# Altium PCB Copy of Motor Controller.PcbDoc (part 3 of 3)
Units mm, origin at the board's own origin, x right, y up, seen from the top; angles counter-clockwise.
Board outline 52 x 52 mm, 6 copper layers (Signal 1, GND1, Signal 2, Power, GND2, Signal 3), stack 1.816 mm thick; 182 components, 97 nets, 695 pads, 1437 vias.
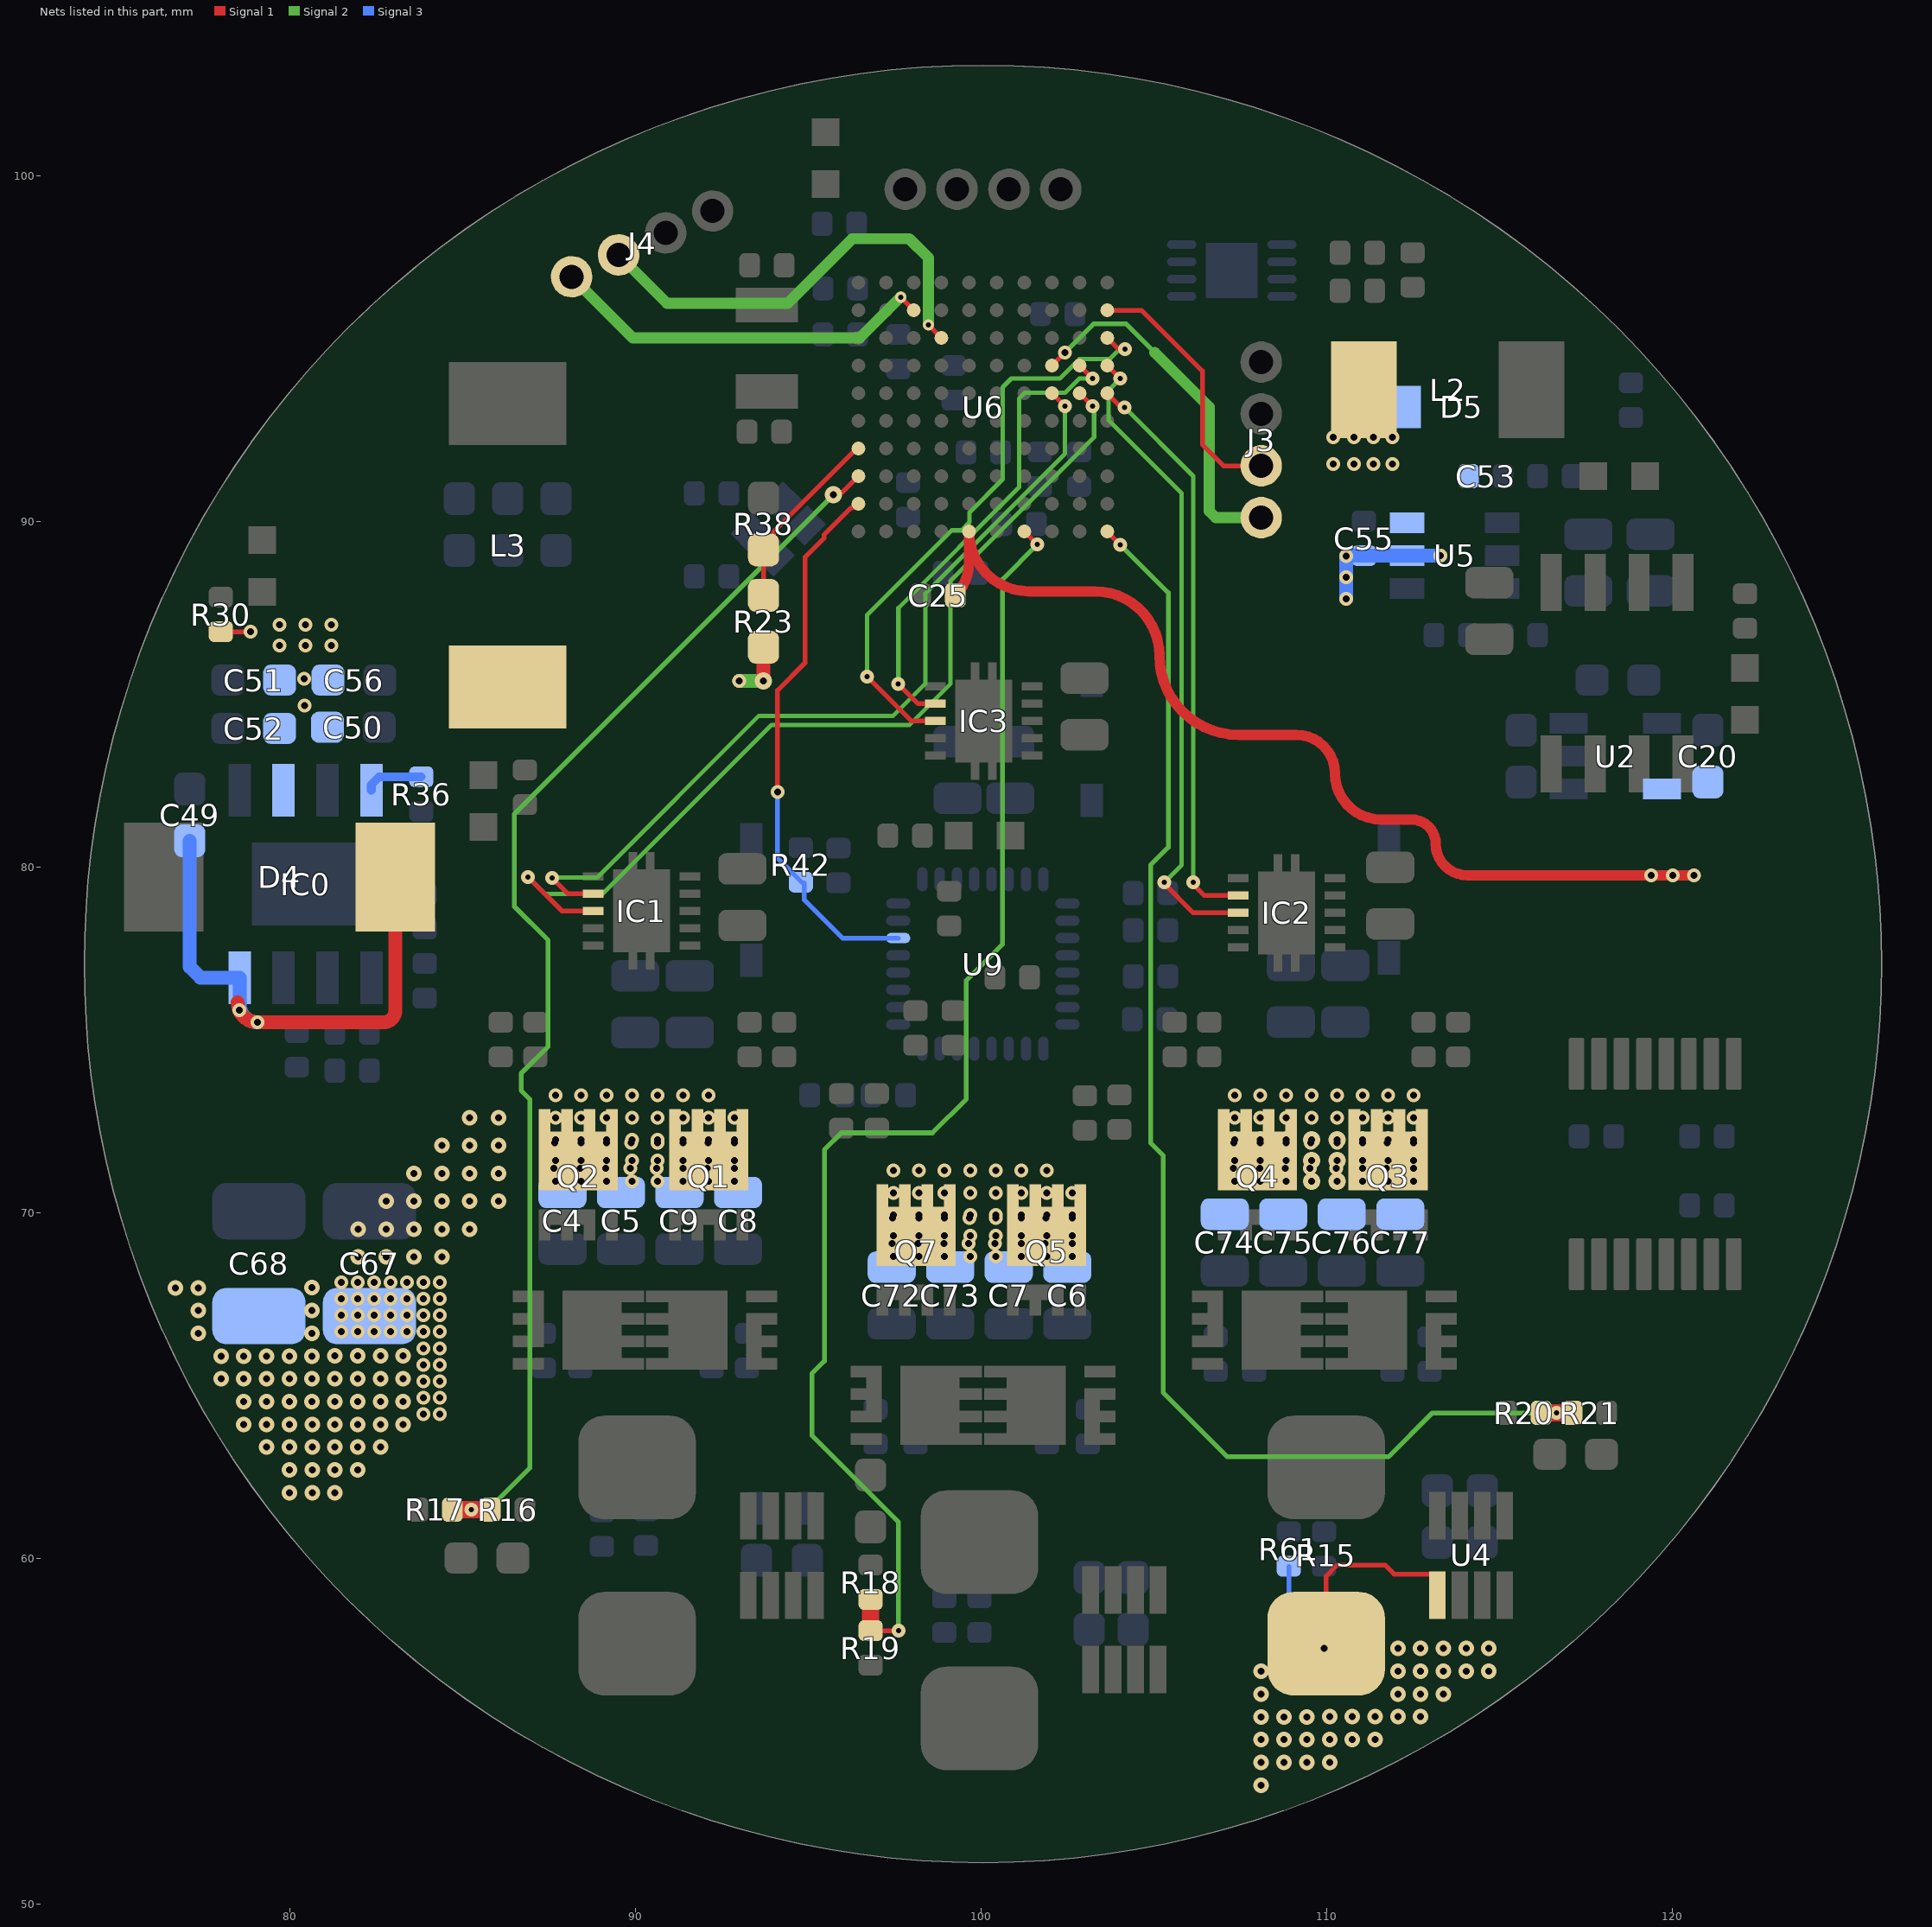
[diagram p7: the nets of this part, all layers, seen from the top]

## Via types
v1: diameter 0.45, hole 0.2, Signal 1 to Signal 3, tented both sides, 210 vias
v2: diameter 0.4, hole 0.2, Signal 1 to Signal 3, tented both sides, 204 vias
v3: diameter 0.45, hole 0.2, Signal 1 to GND1, tented both sides, 168 vias
v4: diameter 0.45, hole 0.2, GND2 to Signal 3, tented both sides, 127 vias
v5: diameter 0.4, hole 0.2, Signal 1 to GND1, tented both sides, 114 vias
v6: diameter 0.4, hole 0.2, Signal 2 to Power, tented both sides, 113 vias
v7: diameter 0.4, hole 0.2, Power to GND2, tented both sides, 100 vias
v8: diameter 0.4, hole 0.2, GND2 to Signal 3, tented both sides, 99 vias
v9: diameter 0.4, hole 0.2, GND1 to Signal 2, tented both sides, 66 vias
v10: diameter 0.4, hole 0.15, Signal 1 to GND1, tented both sides, 62 vias
v11: diameter 0.4, hole 0.15, GND1 to Signal 2, tented both sides, 49 vias
v12: diameter 0.45, hole 0.2, GND1 to Signal 2, tented both sides, 29 vias
v13: diameter 0.5, hole 0.2, Signal 1 to GND1, tented both sides, 25 vias
v14: diameter 0.5/0.5 (per signal layer), hole 0.2, GND2 to Signal 3, tented both sides, 24 vias
v15: diameter 0.45, hole 0.2, Signal 2 to Power, tented both sides, 11 vias
v16: diameter 0.4, hole 0.15, Signal 1 to Signal 3, tented both sides, 9 vias
v17: diameter 0.5, hole 0.2, Signal 1 to Signal 3, 4 vias
v18: diameter 0.5, hole 0.3, Signal 1 to Signal 3, tented both sides, 4 vias
v19: diameter 0.4, hole 0.15, GND2 to Signal 3, tented both sides, 3 vias
v20: diameter 0.3, hole 0.15, Signal 1 to Signal 3, tented both sides, 3 vias
v21: diameter 0.5/0.5 (per signal layer), hole 0.2, GND1 to Signal 2, tented both sides, 2 vias
v22: diameter 0.4, hole 0.2, Signal 1 to Signal 3, 2 vias
v23: diameter 0.4, hole 0.15, Power to GND2, tented both sides, 2 vias
v24: diameter 0.33, hole 0.15, Signal 1 to Signal 3, tented both sides, 2 vias
v25: diameter 0.35, hole 0.15, GND1 to Signal 2, tented both sides, 2 vias
v26: diameter 0.5/0.5 (per signal layer), hole 0.2, Signal 1 to GND1, tented both sides, 1 vias
v27: diameter 0.4, hole 0.2, GND1 to Signal 2, 1 vias
v28: diameter 0.4, hole 0.2, Signal 1 to GND1, 1 vias

## Nets (pads, with @x,y where several pads share a name; then routed paths per layer and width w, separated by ;. In a path a pad name is that pad's centre, name@x,y a point inside that pad or via, vN(x,y) a via of type N, cw(c..) or ccw(c..) an arc to the next point about the centre after c; other vN are vias at no path point) (continued)
"Phase C": R15.1 R61.1 U4.1 | length 8.3
  Signal 1 w0.138: R15.1@109.982,57.521 109.982,59.48 110.302,59.8 111.682,59.8 111.945,59.537 113.027,59.537 U4.1@113.198,59.366
  Signal 3 w0.138: R61.1@108.899,59.762 108.899,58.405 v2(109.919,57.385)
  other v1: 108.103,53.428 108.103,54.087 108.762,54.088 109.42,54.088 110.079,54.089 108.102,54.746 108.761,54.747 109.42,54.747 110.079,54.748 110.738,54.748 111.397,54.749 108.102,55.405 108.761,55.406 109.419,55.406 110.078,55.407 110.737,55.407 111.396,55.408 112.055,55.408 112.714,55.409 108.101,56.064 112.055,56.067 112.714,56.068 113.373,56.068 108.101,56.723 112.054,56.726 112.713,56.726 113.372,56.727 114.031,56.727 114.69,56.728 112.054,57.385 112.713,57.385 113.372,57.386 114.031,57.386 114.69,57.387
PWM1H: IC1.7 U6.E8 | length 24.7
  Signal 1 w0.138: v10(87.589,79.674) 88.039,79.224 IC1.7@88.767,79.224 ; U6.E8@102.047,93.7 v11(102.424,93.323)
  Signal 2 w0.127: v10(87.589,79.674) 87.602,79.688 88.889,79.688 93.568,84.366 97.451,84.366 98.38,85.294 98.38,87.901 102.424,91.946 v11(102.424,93.323)
  other v10: 102.424,93.323
  other v11: 87.589,79.674
PWM1L: IC1.8 U6.E9 | length 27.5
  Signal 1 w0.138: v10(86.886,79.704) 87.866,78.724 IC1.8@88.767,78.724 ; U6.E9@102.847,93.7 v11(103.224,93.323)
  Signal 2 w0.127: v10(86.886,79.704) 87.379,79.211 89.04,79.211 93.934,84.105 97.925,84.105 99.113,85.293 99.113,88.276 103.265,92.428 103.265,93.282 v11(103.224,93.323)
  other v10: 103.224,93.323
  other v11: 86.886,79.704
PWM2H: IC3.7 U6.D9 | length 13.9
  Signal 1 w0.138: v10(97.603,85.288) 98.174,84.717 IC3.7@98.673,84.717 ; U6.D9@102.847,94.5 v10(103.224,94.123)
  Signal 2 w0.127: v10(97.603,85.288) 97.603,87.484 101.092,90.973 101.092,93.545 101.26,93.713 102.426,93.713 102.834,94.121 103.223,94.121 v10(103.224,94.123)
  other v11: 97.603,85.288 103.224,94.123
PWM2L: IC3.8 U6.C10 | length 17.3
  Signal 1 w0.138: v10(96.7,85.5) 97.977,84.223 98.667,84.223 IC3.8@98.673,84.217 ; U6.C10@103.647,95.3 103.949,94.998 104.135,94.998 v11(104.157,94.976)
  Signal 2 w0.127: v10(96.7,85.5) 96.7,87.287 99.145,89.732 99.431,89.732 99.66,89.961 99.66,90.247 100.623,91.21 100.623,93.876 100.87,94.123 102.276,94.123 102.837,94.683 103.712,94.683 103.952,94.924 104.105,94.924 v11(104.157,94.976)
  other v10: 104.157,94.976
  other v11: 96.7,85.5
PWM3H: IC2.7 U6.E10 | length 16.7
  Signal 1 w0.138: U6.E10@103.673,93.663 104.02,93.316 104.12,93.316 v25(104.151,93.285) ; v10(106.135,79.546) 106.135,79.486 106.455,79.166 IC2.7@107.435,79.166
  Signal 2 w0.127: v25(104.151,93.285) 106.135,91.301 106.135,91.201 v10(106.135,79.546)
  other v10: 104.151,93.285
  other v11: 106.135,79.546
PWM3L: IC2.8 U6.D10 | length 18.9
  Signal 1 w0.138: U6.D10@103.647,94.5 v10(104.024,94.123) ; v10(105.294,79.546) 105.294,79.507 106.135,78.666 IC2.8@107.435,78.666
  Signal 2 w0.127: v10(104.024,94.123) 103.688,93.786 103.688,92.915 105.8,90.803 105.8,80.052 v10(105.294,79.546)
  other v11: 105.294,79.546 104.024,94.123
RT: IC0.4 R36.1 | length 1.7
  Signal 3 w0.254: IC0.4@82.355,82.212 82.355,82.375 82.58,82.6 R36.1@83.8,82.6
RX: J4.1 U6.B3 | length 11.3
  Signal 1 w0.138: v24(97.67,96.477) U6.B3@98.047,96.1
  Signal 2 w0.32: J4.1@88.149,97.069 89.918,95.3 96.481,95.3 v24@97.67,96.489
SCK: R42.1 U6.J1 U9.22 | length 16
  Signal 1 w0.138: v2(94.107,82.169) 94.107,85.102 94.899,85.894 94.899,88.952 95.459,89.512 95.459,89.608 96.238,90.387 96.263,90.387 96.376,90.5 U6.J1@96.447,90.5
  Signal 3 w0.138: v2(94.107,82.169) 94.107,80.254 94.828,79.533 94.878,79.533 94.878,79.046 95.986,77.937 U9.22@97.597,77.937
SW: C49.2 D4.1 IC0.8 L3.1 | length 15.7
  Signal 1 w0.4: 78.486,76.073 ccw(c79.059,76.073) v2(79.059,75.5) 82.701,75.5 ccw(c82.701,75.849) 83.05,75.849 D4.1@83.05,79.7
  Signal 3 w0.4: C49.2@77.1,80.75 77.1,77.1 77.412,76.788 IC0.8@78.545,76.788 78.545,76.014 ccw(c79.059,76.014) v2(79.059,75.5)
  other v2: 78.532,75.849
SW1: C53.1 D5.1 L2.1 U5.6
  other v2: 110.181,91.65 110.783,91.65 111.35,91.65 111.899,91.65 110.181,92.425 110.783,92.425 111.35,92.425 111.899,92.425
SWCLK: J3.2 U6.B10 | length 7.6
  Signal 1 w0.138: U6.B10@103.647,96.1 104.636,96.1 106.398,94.339 106.398,92.215 107.012,91.6 J3.2@108.1,91.6
SWDIO: J3.1 U6.D8 | length 10.6
  Signal 1 w0.138: U6.D8@102.047,94.5 v10(102.424,94.877)
  Signal 2 w0.138: v10(102.424,94.877) 103.258,95.711 104.189,95.711 105.023,94.877
  Signal 2 w0.32: 105.023,94.877 106.6,93.3 106.6,90.287 106.787,90.1 J3.1@108.1,90.1
  other v9: 102.424,94.877
TX: J4.2 U6.C4 | length 13
  Signal 1 w0.138: v24(98.47,95.677) U6.C4@98.847,95.3
  Signal 2 w0.32: J4.2@89.509,97.702 90.911,96.3 94.404,96.3 96.275,98.171 97.917,98.171 98.47,97.618 v24@98.47,95.689
VA: R16.2 R17.1 U6.H1 | length 37.1
  Signal 1 w0.138: v21(95.722,90.757) 95.791,90.826 95.973,90.826 U6.H1@96.447,91.3
  Signal 1 w0.5: R17.1@84.7,61.4 v11(85.25,61.4) R16.2@85.8,61.4
  Signal 2 w0.138: v11(85.25,61.4) 85.3,61.35 85.498,61.35 85.519,61.329 85.662,61.329 86.945,62.612 86.945,73.267 86.686,73.527 86.686,74.019 87.467,74.8 87.467,77.871 86.49,78.848 86.49,81.525 v21(95.722,90.757)
  other v10: 85.25,61.4 95.722,90.757
VB: R18.2 R19.1 U6.K7 | length 38.9
  Signal 1 w0.138: R19.1@96.822,57.9 v10(97.604,57.9) ; U6.K7@101.247,89.7 v10(101.624,89.323)
  Signal 1 w0.5: R19.1@96.8,57.9 R18.2@96.8,58.8
  Signal 2 w0.138: v10(97.604,57.9) 97.604,61.043 95.102,63.545 95.102,65.336 95.465,65.699 95.465,71.812 95.953,72.3 98.589,72.3 99.568,73.279 99.568,76.708 100.617,77.757 100.617,88.315 v10(101.624,89.323)
  other v11: 97.604,57.9 101.624,89.323
VBUS: R23.1 R38.2 U6.G1 | length 5.4
  Signal 1 w0.138: R23.1@93.7,87.85 R23.1@93.7,87.85 93.701,89.164 R38.2@93.702,89.165 93.987,89.45 93.987,89.688 96.4,92.1 U6.G1@96.447,92.1
VC: R20.2 R21.1 U6.K10 | length 39.6
  Signal 1 w0.138: U6.K10@103.647,89.7 103.647,89.691 v10(104.024,89.313)
  Signal 1 w0.5: R20.2@116.2,64.2 v10(116.65,64.2) R21.1@117.1,64.2
  Signal 2 w0.138: v10(104.024,89.313) 105.41,87.928 105.41,80.558 104.898,80.046 104.898,72.01 105.26,71.648 105.26,64.79 107.121,62.93 111.782,62.93 113.053,64.2 v10(116.65,64.2)
  other v11: 116.65,64.2 104.024,89.313
VCC: C4.1 C5.1 C6.1 C7.1 C8.1 C9.1 C50.1 C51.1 C52.1 C55.1 C56.1 C67.1 C68.1 C72.1 C73.1 C74.1 C75.1 C76.1 C77.1 IC0.2 Q1.5 Q1.6 Q1.7 Q1.8 Q1.9 Q2.5 Q2.6 Q2.7 Q2.8 Q2.9 Q3.5 Q3.6 Q3.7 Q3.8 Q3.9 Q4.5 Q4.6 Q4.7 Q4.8 Q4.9 Q5.5 Q5.6 Q5.7 Q5.8 Q5.9 Q7.5 Q7.6 Q7.7 Q7.8 Q7.9 R23.2 R30.2 U5.5 | length 6.5
  Signal 1 w0.138: R30.2@78,86.8 v2(78.854,86.8)
  Signal 1 w0.4: v26@93.7,85.371 R23.2@93.7,86.35
  Signal 2 w0.4: v6(92.995,85.371) v26(93.699,85.371)
  Signal 3 w0.4: v2(110.562,87.75) v2(110.562,88.994) ; v2@110.562,89 C55.1@111.072,89 U5.5@112.325,89 v2(113.279,89)
  other v1: 79.983,61.889 80.642,61.89 81.301,61.89 79.983,62.548 80.642,62.549 81.301,62.549 81.96,62.55 79.323,63.207 79.982,63.207 80.641,63.208 81.3,63.208 81.959,63.209 82.618,63.209 78.664,63.865 79.323,63.866 79.982,63.866 80.641,63.867 81.3,63.867 81.959,63.868 82.618,63.868 83.277,63.869 78.663,64.524 79.322,64.525 79.981,64.525 80.64,64.526 81.299,64.526 81.958,64.527 82.617,64.527 83.276,64.528 78.004,65.183 78.663,65.183 79.322,65.184 79.981,65.184 80.64,65.185 81.299,65.185 81.958,65.186 82.617,65.186 83.276,65.187 78.003,65.842 78.662,65.842 79.321,65.843 79.98,65.843 80.639,65.844 81.298,65.844 81.957,65.845 82.616,65.845 83.275,65.846 77.344,66.5 80.639,66.503 77.343,67.159 80.638,67.162 76.684,67.818 77.343,67.818 80.638,67.82
  other v2: 80.42,84.664 80.408,85.441 79.7,86.4 80.446,86.4 81.2,86.4 79.7,86.995 80.446,86.995 81.2,86.995 110.562,88.372
  other v3: 81.973,68.711 82.779,68.711 83.586,68.711 84.392,68.711 81.973,69.518 82.779,69.518 83.586,69.518 84.392,69.518 85.198,69.518 82.779,70.324 83.586,70.324 84.392,70.324 85.198,70.324 86.04,70.324 83.586,71.13 84.392,71.13 85.198,71.13 86.04,71.13 84.392,71.937 85.198,71.937 86.04,71.937 85.198,72.743 86.04,72.743
  other v5: 97.416,69.101 98.178,69.101 98.916,69.101 99.632,69.101 100.394,69.101 101.156,69.101 101.848,69.101 102.633,69.101 97.439,69.833 98.201,69.833 98.94,69.833 99.655,69.833 100.417,69.833 101.156,69.833 101.871,69.833 102.633,69.833 87.637,71.278 88.399,71.278 89.137,71.278 89.853,71.278 90.615,71.278 91.377,71.278 92.069,71.278 92.854,71.278 107.292,71.278 108.054,71.278 108.792,71.278 109.508,71.278 110.27,71.278 111.032,71.278 111.724,71.278 112.509,71.278 87.66,72.01 88.422,72.01 89.161,72.01 89.876,72.01 90.638,72.01 91.377,72.01 92.092,72.01 92.854,72.01 107.315,72.01 108.077,72.01 108.816,72.01 109.531,72.01 110.293,72.01 111.032,72.01 111.747,72.01 112.509,72.01
  other v6: 83.861,64.165 84.337,64.165 83.861,64.641 84.337,64.641 83.861,65.117 84.337,65.117 83.861,65.593 84.337,65.593 83.861,66.069 84.337,66.069 81.481,66.545 81.957,66.545 82.433,66.545 82.909,66.545 83.385,66.545 83.861,66.545 84.337,66.545 81.481,67.021 81.957,67.021 82.433,67.021 82.909,67.021 83.385,67.021 83.861,67.021 84.337,67.021 81.481,67.497 81.957,67.497 82.433,67.497 82.909,67.497 83.385,67.497 83.861,67.497 84.337,67.497 81.481,67.973 81.957,67.973 82.433,67.973 82.909,67.973 83.385,67.973 83.861,67.973 84.337,67.973 97.462,70.566 98.201,70.566 98.94,70.566 99.678,70.566 100.417,70.566 101.156,70.566 101.894,70.566 102.633,70.566 97.462,71.208 98.201,71.208 98.94,71.208 99.678,71.208 100.417,71.208 101.156,71.208 101.894,71.208 87.683,72.743 88.422,72.743 89.161,72.743 89.899,72.743 90.638,72.743 91.377,72.743 92.115,72.743 92.854,72.743 107.338,72.743 108.077,72.743 108.816,72.743 109.554,72.743 110.293,72.743 111.032,72.743 111.77,72.743 112.509,72.743 87.683,73.385 88.422,73.385 89.161,73.385 89.899,73.385 90.638,73.385 91.377,73.385 92.115,73.385 107.338,73.385 108.077,73.385 108.816,73.385 109.554,73.385 110.293,73.385 111.032,73.385 111.77,73.385 112.509,73.385
  other v7: 97.462,68.729 98.201,68.729 98.94,68.729 99.678,68.729 100.417,68.729 101.156,68.729 101.894,68.729 102.633,68.729 97.462,69.327 98.201,69.327 98.94,69.327 99.678,69.327 100.417,69.327 101.156,69.327 101.894,69.327 102.633,69.327 97.462,69.924 98.201,69.924 98.94,69.924 99.678,69.924 100.417,69.924 101.156,69.924 101.894,69.924 102.633,69.924 87.683,70.906 88.422,70.906 89.161,70.906 89.899,70.906 90.638,70.906 91.377,70.906 92.115,70.906 92.854,70.906 107.338,70.906 108.077,70.906 108.816,70.906 109.554,70.906 110.293,70.906 111.032,70.906 111.77,70.906 112.509,70.906 87.683,71.503 88.422,71.503 89.161,71.503 89.899,71.503 90.638,71.503 91.377,71.503 92.115,71.503 92.854,71.503 107.338,71.503 108.077,71.503 108.816,71.503 109.554,71.503 110.293,71.503 111.032,71.503 111.77,71.503 112.509,71.503 87.683,72.101 88.422,72.101 89.161,72.101 89.899,72.101 90.638,72.101 91.377,72.101 92.115,72.101 92.854,72.101 107.338,72.101 108.077,72.101 108.816,72.101 109.554,72.101 110.293,72.101 111.032,72.101 111.77,72.101 112.509,72.101
  other v8: 97.462,68.729 98.201,68.729 98.94,68.729 99.678,68.729 100.417,68.729 101.156,68.729 101.894,68.729 102.633,68.729 97.462,69.327 98.201,69.327 98.94,69.327 99.678,69.327 100.417,69.327 101.156,69.327 101.894,69.327 102.633,69.327 97.462,69.924 98.201,69.924 98.94,69.924 99.678,69.924 100.417,69.924 101.156,69.924 101.894,69.924 102.633,69.924 87.683,70.906 88.422,70.906 89.161,70.906 89.899,70.906 90.638,70.906 91.377,70.906 92.115,70.906 92.854,70.906 87.683,71.503 88.422,71.503 89.161,71.503 89.899,71.503 90.638,71.503 91.377,71.503 92.115,71.503 92.854,71.503 87.683,72.101 88.422,72.101 89.161,72.101 89.899,72.101 90.638,72.101 91.377,72.101 92.115,72.101 92.854,72.101
  other v9: 97.416,69.101 98.178,69.101 98.916,69.101 99.632,69.101 100.394,69.101 101.156,69.101 101.848,69.101 102.633,69.101 97.439,69.833 98.201,69.833 98.94,69.833 99.655,69.833 100.417,69.833 101.156,69.833 101.871,69.833 102.633,69.833 87.637,71.278 88.399,71.278 89.137,71.278 89.853,71.278 90.615,71.278 91.377,71.278 92.069,71.278 92.854,71.278 107.292,71.278 108.054,71.278 108.792,71.278 109.508,71.278 110.27,71.278 111.032,71.278 111.724,71.278 112.509,71.278 87.66,72.01 88.422,72.01 89.161,72.01 89.876,72.01 90.638,72.01 91.377,72.01 92.092,72.01 92.854,72.01 107.315,72.01 108.077,72.01 108.816,72.01 109.531,72.01 110.293,72.01 111.032,72.01 111.747,72.01 112.509,72.01
  other v12: 81.973,68.711 82.779,68.711 83.586,68.711 84.392,68.711 81.973,69.518 82.779,69.518 83.586,69.518 84.392,69.518 85.198,69.518 82.779,70.324 83.586,70.324 84.392,70.324 85.198,70.324 86.04,70.324 83.586,71.13 84.392,71.13 85.198,71.13 86.04,71.13 84.392,71.937 85.198,71.937 86.04,71.937 85.198,72.743 86.04,72.743
  other v14: 107.338,70.906 108.077,70.906 108.816,70.906 109.554,70.906 110.293,70.906 111.032,70.906 111.77,70.906 112.509,70.906 107.338,71.503 108.077,71.503 108.816,71.503 109.554,71.503 110.293,71.503 111.032,71.503 111.77,71.503 112.509,71.503 107.338,72.101 108.077,72.101 108.816,72.101 109.554,72.101 110.293,72.101 111.032,72.101 111.77,72.101 112.509,72.101
  other v21: 93.699,85.371
VDDA: C20.1 C25.1 U2.5 U6.K5 | length 28.6
  Signal 1 w0.3: C25.1@99.253,87.85 ccw(c98.3,88.802) 99.647,88.802 U6.K5@99.647,89.7 ccw(c101.38,89.7) 101.38,87.967 103.295,87.967 cw(c103.295,86.106) 105.156,86.106 ccw(c107.446,86.106) 107.446,83.816 109.119,83.816 cw(c109.119,82.7) 110.235,82.7 ccw(c111.569,82.7) 111.569,81.366 112.446,81.366 cw(c112.446,80.662) 113.15,80.662 ccw(c114.056,80.662) 114.056,79.756 v2(119.38,79.756) v2(120.008,79.756) v2(120.625,79.756)
pads on no net: IC0.3 IC1.2 IC2.2 IC3.2 J3.4 J4.4 U5.4 U6.A2 U6.A5 U6.A6 U6.A7 U6.A8 U6.A9 U6.A10 U6.B1 U6.B2 U6.B4 U6.B6 U6.B7 U6.B8 U6.B9 U6.C2 U6.C3 U6.C5 U6.C6 U6.C7 U6.C8 U6.C9 U6.D4 U6.E3 U6.E4 U6.F1 U6.F2 U6.F4 U6.F8 U6.F9 U6.F10 U6.G2 U6.G3 U6.G4 U6.G5 U6.G6 U6.G7 U6.G8 U6.G9 U6.H2 U6.H3 U6.H4 U6.H5 U6.H6 U6.H7 U6.H8 U6.H9 U6.J3 U6.J4 U6.J6 U6.J7 U6.J8 U6.J9 U6.K3 U7.5 U7.6 U7.7 U7.10 U7.11 U7.12 U8.5 U9.9 U9.10 U9.12 U9.13 U9.15 U9.16 U9.18 U9.25 U9.26 U9.28 U9.29 U9.31 U9.32 U10.5 U10.8

## Polygon pours and split planes (outlines as drawn)
VCC on Signal 3 (solid, pour order 146): 80.414,60.212 ccw(c80.421,63.086) 82.449,61.049 82.633,61.233 ccw(c80.466,63.4) 83.531,63.401 cw(c84.239,63.401) 84.239,64.109 84.709,64.109 ccw(c84.709,64.69) 85.29,64.69 85.29,65.429 cw(c85.942,65.429) 85.689,66.031 ccw(c85.29,66.98) 86.32,66.98 86.32,69.65 cw(c86.79,69.65) 86.79,70.12 93.658,70.12 cw(c93.658,68.803) 94.589,69.734 95.942,68.382 ccw(c96.932,69.372) 96.932,67.972 102.985,67.972 ccw(c102.985,68.167) 103.111,68.017 cw(c103.61,67.422) 103.61,68.199 104.348,68.199 ccw(c104.348,69.226) 105.074,68.5 105.595,69.021 cw(c106.734,67.882) 106.734,69.493 112.688,69.493 ccw(c112.688,69.778) 112.973,69.778 112.973,72.797 ccw(c112.777,72.797) 112.777,72.993 106.501,72.993 ccw(c106.501,72.787) 106.295,72.787 cw(c105.988,72.787) 105.988,72.48 105.782,72.48 93.945,72.48 cw(c93.945,72.756) 93.669,72.756 93.669,73.377 ccw(c93.426,73.377) 93.426,73.62 87.296,73.62 ccw(c87.295,72.887) 86.776,73.405 85.007,71.636 ccw(c85.82,70.822) 84.67,70.822 84.67,69.137 cw(c84.099,69.136) 84.502,68.732 84.139,68.369 cw(c83.731,68.776) 83.731,68.2 75.7,68.2 ccw(c100.05,77.185)
GND on Signal 3 "GND_L06_P122" (solid, pour order 122): 105.922,66.87 105.922,67.645 106.493,68.216 106.493,68.535 106.721,68.763 112.354,68.763 112.582,68.535 112.582,68.216 113.153,67.645 113.153,66.87
+3.3V on Signal 3 "NONET_L03_P-001" (solid, pour order 111): 120.064,89.165 120.064,90.075 120.061,90.804 116.874,90.804 116.874,90.075 116.874,89.165
SW1 on Signal 3 "SW1_L06_P043" (solid, pour order 43): 111.846,90.95 111.828,89.65 112.825,89.65 112.825,90.089 cw(c112.986,90.089) 112.872,90.203 113.619,90.95 114.25,90.95 ccw(c114.25,91.1) 114.4,91.1 114.4,91.5 ccw(c114.25,91.5) 114.25,91.65 113.76,91.65 112.72,92.69 112.72,93.9 109.9,93.9 109.9,90.95
GND on Signal 3 "GND_L06_P121" (solid, pour order 121): 96.143,65.338 96.143,66.113 96.714,66.684 96.714,67.003 96.942,67.231 102.575,67.231 102.803,67.003 102.803,66.684 103.374,66.113 103.374,65.338
+12V on Signal 3 "+12V_L06_P058" (solid, pour order 58): 87.725,90.175 84.875,90.175 cw(c84.875,90.45) 84.6,90.45 84.6,94.6 88,94.6 88,92.2 88,90.45 cw(c87.725,90.45)
GND on Signal 3 "GND_L06_P120" (solid, pour order 120): 86.618,67.497 86.618,68.272 87.189,68.843 87.189,69.162 87.417,69.39 93.05,69.39 93.278,69.162 93.278,68.843 93.849,68.272 93.849,67.497
GND on Signal 3 "GND_L06_P088" (solid, pour order 88): 75.085,69.944 cw(c100.314,77.682) 74.264,73.464 74.3,73.55 74.893,73.55 cw(c74.893,71.793) 76.136,73.036 76.136,73.035 ccw(c77.066,73.966) 77.066,72.65 79.076,72.65 ccw(c79.076,73.624) 79.764,72.936 cw(c80.283,72.417) 80.283,73.15 82.034,73.15 cw(c82.034,71.734) 83.036,72.736 cw(c81.431,71.131) 83.7,71.131 83.7,69.68 83.65,69.63 75.872,69.63 cw(c75.872,70.772)
VDDA on Signal 3 "NONET_L03_P-001" (solid, pour order 108): 119.15,82.55 120.25,82.55 120.625,82.925 121.264,82.925 121.8,82.388 121.8,79.375 119.15,79.375 119.15,81.95
VCC on Signal 3 "VCC_L06_P053" (solid, pour order 53): 79.49,81.449 80.14,81.449 80.14,82.974 80.752,83.586 81.331,83.586 ccw(c81.331,83.811) 81.556,83.811 81.556,85.737 81.556,87.3 79.225,87.3 79.225,85.718 79.225,83.682 79.49,83.417 79.49,82.974
"Phase C" on Signal 3 "PHASE_C_L06_P092" (solid, pour order 92): 107.79,52.364 ccw(c100.05,77.185) 115.448,56.235 115.448,57.452 114.906,57.994 108.659,57.994 107.79,57.125
"Phase B" on Signal 3 "PHASE_B_L06_P091" (solid, pour order 91): 93.98,51.919 ccw(c100.05,77.185) 106.092,51.912 106.1,51.913 106.1,55.4 105.7,55.8 94.444,55.8 93.98,55.337
"Phase A" on Signal 3 "PHASE_A_L06_P093" (solid, pour order 93): 82.662,57.868 ccw(c100.05,77.185) 92.402,52.345 92.4,52.345 92.4,56.1 89.9,58.6 82.8,58.6 82.662,58.462
GND on Signal 1 "GND_L01_P142" (solid, pour order 142): 75.085,69.944 cw(c100.313,77.682) 74.264,73.464 74.3,73.55 74.893,73.55 cw(c74.893,71.793) 76.009,73.15 80.283,73.15 81.941,73.15 cw(c81.941,71.491) 83.561,71.854 81.314,69.63 75.872,69.63 cw(c75.872,70.772)
GND on Signal 1 "GND_L01_P117" (solid, pour order 117): 106.996,67.736 107.017,67.757 107.017,68.856 106.631,69.243 105.971,69.243 104.927,68.199 104.013,68.199 103.866,68.052 103.866,66.098 106.096,66.098 106.099,66.101 106.996,66.101
GND on Signal 1 "NONET_L03_P-001" (solid, pour order 112): 87.341,67.736 87.339,67.738 85.075,67.738 84.711,67.374 84.711,64.411 83,62.7 83,59.8 83.7,59.1 85.2,59.1 85.425,59.325 85.425,60.225 85.2,60.45 84.6,60.45 83.956,61.094 83.956,62.056 84.616,62.716 87.341,62.716 87.341,66.101
VCC on Signal 1 "NONET_L03_P-001" (solid, pour order 105): 81.119,61.619 84.3,64.8 84.3,67.742 87.191,70.633 93.691,70.633 95.868,68.456 103.04,68.456 104.951,68.456 106.341,69.846 107.128,70.633 113.133,70.633 113.2,70.7 113.2,72.993 106.1,72.993 106.1,72.191 104.725,70.816 103.04,70.816 95.88,70.816 94.766,71.93 94.766,73.4 85.5,73.4 85,72.9 80.3,68.2 75.643,68.2 75.661,68.171 ccw(c100.05,77.185) 81.119,59.36
+5V on Signal 1 "NONET_L03_P-001" (solid, pour order 133): 114.973,92.405 114.973,96.023 117.472,96.023 117.472,92.405
GND on Signal 1 "NONET_L03_P-001" (solid, pour order 113): 93.202,67.085 93.202,65.02 94.079,64.143 95.998,64.143 96.22,63.921 96.223,63.923 97.12,63.923 97.12,65.558 95.593,67.085 94.105,67.085 94.102,67.088
GND on Signal 1 "GND_L01_P064" (solid, pour order 64): 107.135,78.046 107.91,78.046 108.01,77.946 108.01,77.466 108.46,77.466 108.46,76.966 108.71,76.966 108.71,77.466 108.96,77.466 108.96,76.966 109.21,76.966 109.21,77.466 109.66,77.466 109.66,79.866 109.21,79.866 109.21,80.366 108.96,80.366 108.96,79.866 108.71,79.866 108.71,80.366 108.46,80.366 108.46,79.866 108.01,79.866 108.01,78.304 107.992,78.286 107.135,78.286
GND on Signal 1 "GND_L01_P065" (solid, pour order 65): 98.373,83.597 99.148,83.597 99.248,83.497 99.248,83.017 99.698,83.017 99.698,82.517 99.948,82.517 99.948,83.017 100.198,83.017 100.198,82.517 100.448,82.517 100.448,83.017 100.898,83.017 100.898,85.417 100.448,85.417 100.448,85.917 100.198,85.917 100.198,85.417 99.948,85.417 99.948,85.917 99.698,85.917 99.698,85.417 99.248,85.417 99.248,83.855 99.23,83.837 98.373,83.837
SW on Signal 1 "SW_L01_P057" (solid, pour order 57): 81.9,78.125 81.9,83.7 84.6,86.4 88,86.4 88,84 84.8,84 84.2,83.4 84.2,78.125
GND on Signal 1 "GND_L01_P076" (solid, pour order 76): 113.608,59.614 116.84,59.614 116.84,58.244 113.608,58.244
GND on Signal 1 "GND_L01_P118" (solid, pour order 118): 112.857,67.085 112.857,65.45 112.903,65.405 112.903,64.082 113.042,63.943 114.43,63.943 114.43,64.752 114.575,64.897 116.332,64.897 116.88,65.445 116.88,66.756 114.694,66.756 114.362,67.088 112.86,67.088
GND on Signal 1 "NONET_L03_P-001" (solid, pour order 116): 102.981,64.909 102.981,61.819 103.5,61.3 106.4,61.3 106.858,61.758 106.858,63.593 106.708,63.743 106.308,63.743 105.551,64.5 104.5,64.5 104.089,64.911 103.881,64.911
GND on Signal 1 "GND_L01_P063" (solid, pour order 63): 88.467,78.104 89.242,78.104 89.342,78.004 89.342,77.524 89.792,77.524 89.792,77.024 90.042,77.024 90.042,77.524 90.292,77.524 90.292,77.024 90.542,77.024 90.542,77.524 90.992,77.524 90.992,79.924 90.542,79.924 90.542,80.424 90.292,80.424 90.292,79.924 90.042,79.924 90.042,80.424 89.792,80.424 89.792,79.924 89.342,79.924 89.342,78.362 89.324,78.344 88.467,78.344
"Phase C" on Signal 1 "PHASE_C_L01_P079" (solid, pour order 79): 107.75,52.395 ccw(c107.8,52.4) 107.848,52.383 ccw(c100.05,77.185) 116.632,57.161 116.636,57.236 ccw(c115.634,56.234) 115.634,57.65 113.871,57.65 cw(c113.871,60.666) 111.739,58.534 111.646,58.627 ccw(c110.606,57.587) 110.606,59.057 108.863,59.057 ccw(c108.863,57.944) 107.75,57.944
"Phase B" on Signal 1 "PHASE_B_L01_P078" (solid, pour order 78): 94,51.9 94,54.83 cw(c95.27,54.83) 95.27,56.1 97.6,56.1 ccw(c97.6,56.4) 97.9,56.4 cw(c98.362,56.4) 98.362,56.862 101.724,56.862 cw(c101.724,56.4) 102.186,56.4 cw(c102.186,56.386) 102.2,56.386 102.2,56.07 ccw(c103.47,56.07) 103.47,54.8 105,54.8 cw(c105,53.7) 106.1,53.7 106.1,51.914 106.087,51.898 cw(c100.047,77.187)
HS3 on Signal 1 "HS3_L01_P002" (solid, pour order 2): 107.536,61.852 107.536,68.642 106.848,69.329 106.848,70.089 108.484,70.089 108.484,67.74 110.626,67.74 110.626,70.089 111.891,70.089 112.321,70.089 112.315,69.726 112.321,69.196 112.291,69.193 112.289,67.74 112.317,67.738 112.303,61.852
HS2 on Signal 1 "HS2_L01_P001" (solid, pour order 1): 97.663,59.663 97.663,66.449 96.972,67.139 96.972,67.9 98.607,67.9 98.607,65.549 100.752,65.549 100.752,67.9 102.014,67.9 102.39,67.9 102.39,65.552 102.441,65.549 102.426,59.663
HS1 on Signal 1 "HS1_L01_P000" (solid, pour order 0): 87.884,61.849 87.884,68.408 ccw(c87.47,68.408) 87.762,68.701 87.191,69.273 87.191,70.086 88.827,70.086 88.827,67.737 90.986,67.737 90.986,70.086 92.18,70.086 92.611,70.086 92.604,69.723 92.611,69.193 92.581,69.19 92.579,67.737 92.66,67.733 92.646,61.849
"Phase A" on Signal 1 "PHASE_A_L01_P084" (solid, pour order 84): 83.1,57.5 cw(c85.031,55.569) 85.031,58.3 87.833,58.3 ccw(c87.833,59.087) 88.389,58.531 cw(c89.539,57.38) 89.539,59.007 91.137,59.007 cw(c91.137,57.944) 92.2,57.944 92.2,52.4 cw(c100.047,77.187)
GND on Signal 1 "GND_L01_P060" (solid, pour order 60): 77.5,81.275 77.5,76.4 75.184,76.4 75.184,81.275
+12V on Signal 1 "+12V_L01_P059" (solid, pour order 59): 84.6,94.6 84.6,90.336 84.761,90.175 87.839,90.175 88,90.336 88,94.6
SW1 on Signal 1 "SW1_L01_P044" (solid, pour order 44): 110.022,95.195 112.122,95.195 112.122,90.9 110.022,90.9
VCC on Top Solder "NONET_L03_P-001" (solid, pour order 144): 81.119,61.619 84.3,64.8 84.3,67.74 85.115,68.555 83.466,70.204 81.462,68.2 75.643,68.2 75.661,68.171 ccw(c100.051,77.185) 81.119,59.36
GND on Top Solder "GND_L01_P143" (solid, pour order 143): 75.085,69.944 cw(c100.313,77.682) 74.264,73.464 74.3,73.55 74.893,73.55 cw(c74.893,71.793) 76.009,73.15 80.283,73.15 81.941,73.15 cw(c81.941,71.491) 83.456,72.169 80.891,69.63 75.872,69.63 cw(c75.872,70.772)
"Phase C" on Top Solder "PHASE_C_L01_P086" (solid, pour order 86): 107.75,52.395 ccw(c107.8,52.4) 107.848,52.383 ccw(c100.05,77.185) 116.632,57.161 116.636,57.236 ccw(c115.634,56.234) 115.634,57.65 113.871,57.65 cw(c113.871,60.666) 111.739,58.534 111.646,58.627 ccw(c110.606,57.587) 110.606,59.057 108.863,59.057 ccw(c108.863,57.944) 107.75,57.944
"Phase B" on Top Solder "PHASE_B_L01_P085" (solid, pour order 85): 94,51.9 94,54.83 cw(c95.27,54.83) 95.27,56.1 97.6,56.1 ccw(c97.6,56.4) 97.9,56.4 cw(c98.362,56.4) 98.362,56.862 101.724,56.862 cw(c101.724,56.4) 102.186,56.4 cw(c102.186,56.386) 102.2,56.386 102.2,56.07 ccw(c103.47,56.07) 103.47,54.8 105,54.8 cw(c105,53.7) 106.1,53.7 106.1,51.914 106.087,51.898 cw(c100.047,77.187)
"Phase A" on Top Solder "PHASE_A_L01_P077" (solid, pour order 77): 83.1,57.5 cw(c85.031,55.569) 85.031,58.3 87.833,58.3 ccw(c87.833,59.087) 88.389,58.531 cw(c89.539,57.38) 89.539,59.007 91.137,59.007 cw(c91.137,57.944) 92.2,57.944 92.2,52.4 cw(c100.047,77.187)
GND on GND2 "GND_L05_P128" (solid, pour order 128): 74.382,73.137 cw(c100.073,77.137) 74.382,81.137 cw(c100.073,77.137) 81.688,95.522 cw(c100.073,77.137) 118.458,95.522 cw(c100.073,77.137) 125.763,81.137 cw(c100.073,77.137) 125.763,73.137 cw(c100.073,77.137) 118.458,58.752 cw(c100.073,77.137) 81.688,58.752 cw(c100.073,77.137)
"Phase C" on Bottom Solder "PHASE_C_L04_P096" (solid, pour order 96): 107.79,52.364 ccw(c100.05,77.185) 115.448,56.235 115.448,57.452 114.906,57.994 108.659,57.994 107.79,57.125
"Phase B" on Bottom Solder "PHASE_B_L04_P095" (solid, pour order 95): 93.98,51.919 ccw(c100.05,77.185) 106.092,51.912 106.1,51.913 106.1,55.4 105.7,55.8 94.444,55.8 93.98,55.337
"Phase A" on Bottom Solder "PHASE_A_L04_P094" (solid, pour order 94): 82.662,57.868 ccw(c100.05,77.185) 92.402,52.345 92.4,52.345 92.4,56.1 89.9,58.6 82.8,58.6 82.662,58.462
GND on Bottom Solder "GND_L01_P081" (solid, pour order 81): 75.085,69.944 cw(c100.314,77.682) 74.264,73.464 74.3,73.55 74.893,73.55 cw(c74.893,71.793) 76.136,73.036 76.136,73.035 ccw(c77.066,73.966) 77.066,72.65 79.076,72.65 ccw(c79.076,73.624) 79.764,72.936 cw(c80.283,72.417) 80.283,73.15 82.034,73.15 cw(c82.034,71.734) 83.036,72.736 cw(c81.431,71.131) 83.7,71.131 83.7,69.68 83.65,69.63 75.872,69.63 cw(c75.872,70.772)
VCC on Bottom Solder "VCC_L01_P082" (solid, pour order 82): 80.414,60.212 cw(c100.05,77.185) 75.7,68.2 82.904,68.2 cw(c82.904,67.485) 83.409,67.991 cw(c83.116,67.697) 83.531,67.697 83.531,63.401 cw(c80.465,63.401) 82.633,61.233 82.449,61.049 cw(c80.4,63.097)
+3.3V on Power "NONET_L03_P-001" (solid, pour order 131): 92.47,58.829 ccw(c93.804,58.829) 93.804,57.496 106.487,57.496 ccw(c106.487,59.043) 107.581,57.949 107.582,57.949 cw(c109.316,56.214) 109.316,58.667 114.865,58.667 ccw(c114.865,61.797) 117.079,59.584 118.273,60.779 ccw(c116.06,62.992) 119.19,62.992 119.19,64.348 cw(c120.223,64.348) 120.223,65.381 120.269,65.381 ccw(c120.269,66.301) 121.189,66.301 121.189,70.916 cw(c121.92,70.916) 121.92,71.647 ccw(c121.92,72.981) 123.254,72.981 123.254,80.01 ccw(c122.555,80.01) 122.555,80.709 cw(c122.555,80.998) 122.266,80.998 122.266,81.897 cw(c122.555,81.897) 122.555,82.186 ccw(c122.555,82.758) 123.127,82.758 123.127,88.011 ccw(c122.301,88.011) 122.301,88.837 122.174,88.837 cw(c122.174,89.281) 121.73,89.281 ccw(c120.66,89.281) 120.66,90.351 120.65,90.351 cw(c120.65,90.833) 120.168,90.833 120.168,91.42 ccw(c118.834,91.42) 118.834,92.754 116.11,92.754 cw(c116.11,93.96) 114.904,93.96 114.904,95.247 ccw(c113.571,95.247) 114.892,95.426 ccw(c113.655,95.259) 113.814,96.496 cw(c114.08,98.576) 112.598,97.094 111.237,98.454 cw(c113.935,101.152) 110.356,99.83 ccw(c108.726,99.227) 108.726,100.965 105.359,100.965 ccw(c105.359,99.301) 103.695,99.301 103.695,97.961 cw(c102.489,97.961) 102.489,96.755 100.15,96.755 ccw(c100.15,96.265) 99.66,96.265 cw(c99.559,96.265) 99.559,96.164 96.607,96.164 ccw(c96.607,95.039) 95.482,95.039 95.482,93.211 ccw(c96.069,93.211) 96.07,92.624 cw(c96.07,91.699) 96.994,91.699 96.994,89.889 ccw(c97.247,89.889) 97.247,89.636 cw(c97.247,89.216) 97.667,89.216 97.667,83.312 cw(c96.461,83.312) 96.461,82.106 95.768,82.106 ccw(c95.768,81.651) 95.313,81.651 95.313,80.424 ccw(c95.768,80.424) 95.768,79.969 96.143,79.969 cw(c96.143,79.66) 96.452,79.66 96.452,78.981 ccw(c97.06,78.981) 97.06,78.373 97.591,78.373 cw(c97.591,78) 97.964,78 97.964,76.605 cw(c97.591,76.605) 97.591,76.232 97.245,76.232 ccw(c97.245,75.738) 96.751,75.738 96.751,75.016 ccw(c97.282,75.016) 97.282,74.485 cw(c97.282,73.914) 97.853,73.914 ccw(c98.442,73.914) 98.442,73.325 104.236,73.325 ccw(c104.236,73.787) 104.697,73.787 cw(c105.903,73.787) 105.903,74.993 108.815,74.993 ccw(c108.815,75.97) 109.792,75.97 109.792,88.83 cw(c110.998,88.83) 110.998,90.036 112.827,90.036 cw(c112.828,88.83) 114.034,88.83 114.034,87.003 114.042,86.97 114.042,80.107 ccw(c115.13,80.107) 115.13,79.018 cw(c115.13,77.812) 116.336,77.812 116.336,76.64 ccw(c119.466,76.64) 117.253,74.427 117.557,74.123 117.557,74.122 cw(c116.683,73.248) 117.919,73.248 117.919,73.152 cw(c116.757,73.152) 117.579,72.33 117.185,71.936 ccw(c119.398,69.723) 116.268,69.723 116.268,64.929 cw(c115.302,64.929) 115.985,64.245 cw(c114.999,65.23) 114.999,63.837 114.958,63.837 ccw(c114.958,62.552) 113.672,62.552 113.672,61.468 cw(c112.466,61.468) 112.466,60.262 105.735,60.262 cw(c105.735,60.807) 105.19,60.807 ccw(c104.465,60.807) 104.465,61.532 ccw(c104.465,60.789) 103.722,60.789 103.722,60.198 cw(c103.252,60.198) 103.251,59.727 102.918,59.727 cw(c102.918,60.009) 102.636,60.009 ccw(c102.129,60.009) 102.129,60.516 97.698,60.516 cw(c97.698,61.722) 96.492,61.722 96.492,61.976 ccw(c95.158,61.976) 95.158,63.31 93.599,63.31 ccw(c93.599,62.181) 92.47,62.181
VCC on Power "NONET_L03_P-001" (solid, pour order 132): 81.044,59.412 84.171,59.412 ccw(c84.171,60.746) 85.505,60.746 85.505,67.973 cw(c86.711,67.973) 86.711,69.179 94.897,69.179 cw(c94.897,68.272) 95.804,68.272 ccw(c96.383,68.272) 96.383,67.693 105.715,67.693 ccw(c105.715,68.763) 106.784,68.763 cw(c107.201,68.763) 107.201,69.179 111.703,69.179 ccw(c111.703,70.513) 113.037,70.513 113.037,78.355 cw(c113.284,78.355) 113.284,78.602 ccw(c113.284,79.082) 113.764,79.082 113.764,88.83 ccw(c112.769,88.83) 112.769,89.824 111.016,89.824 ccw(c111.016,88.83) 110.021,88.83 110.021,75.998 cw(c108.815,75.998) 108.815,74.792 105.888,74.792 ccw(c105.888,73.738) 104.834,73.738 cw(c104.153,73.738) 104.153,73.057 98.089,73.057 cw(c98.089,73.62) 97.526,73.62 ccw(c96.787,73.62) 96.787,74.359 83.566,74.359 cw(c83.566,75.565) 82.36,75.565 82.36,81.987 cw(c83.566,81.987) 83.566,83.193 94.107,83.193 ccw(c94.107,84.527) 95.441,84.527 95.441,86.368 ccw(c94.107,86.368) 94.107,87.701 76.22,87.701 76.158,87.622 ccw(c100.093,77.233)
VCC on Signal 2 "NONET_L03_P-001" (solid, pour order 137): 102.943,71.816 102.943,68.456 97.196,68.456 97.196,71.816
VCC on Signal 2 "NONET_L03_P-001" (solid, pour order 136): 93.164,73.993 93.164,70.633 87.417,70.633 87.417,73.993
"Phase C" on Signal 2 "NONET_L03_P-001" (solid, pour order 139): 107.184,52.175 107.184,57.162 108.769,58.747 116.969,58.747 117.685,58.032 cw(c100.093,77.233)
"Phase B" on Signal 2 "NONET_L03_P-001" (solid, pour order 140): 93.677,51.994 ccw(c100.093,77.233) 106.42,51.972 106.42,55.197 104.755,56.862 94.886,56.862 93.677,55.652
"Phase A" on Signal 2 "NONET_L03_P-001" (solid, pour order 141): 82.501,58.032 ccw(c100.093,77.233) 93.001,52.175 93.001,57.162 91.416,58.747 83.216,58.747
VCC on Signal 2 "NONET_L03_P-001" (solid, pour order 138): 112.819,73.993 112.819,70.633 107.071,70.633 107.071,73.993
VCC on Signal 2 "NONET_L03_P-001" (solid, pour order 135): 80.892,59.641 81.041,59.641 85,63.6 85,67.986 86.36,69.346 86.36,73.032 85.992,73.4 84.567,73.4 81.308,70.141 75.035,70.141 ccw(c100.093,77.233)
GND on GND1 "GND_L02_P071" (solid, pour order 71): 74.382,73.137 cw(c100.073,77.137) 74.382,81.137 cw(c100.073,77.137) 81.688,95.522 cw(c100.073,77.137) 118.458,95.522 cw(c100.073,77.137) 125.763,81.137 cw(c100.073,77.137) 125.763,73.137 cw(c100.073,77.137) 118.458,58.752 cw(c100.073,77.137) 81.688,58.752 cw(c100.073,77.137)

## Other copper
Signal 1:
  rectangle net +3.3V: 117.304,81.153 119.4,84.658
  rectangle net +3.3V: 117.304,86.644 119.4,89.87
Signal 2:
  region net +3.3V: 117.221,84.582 119.38,84.582 119.38,81.087 117.221,81.087
  region net +3.3V: 117.221,89.916 119.38,89.916 119.38,86.614 117.221,86.614
Signal 3:
  region net GND: 101.899,75.333 101.899,78.703 101.566,79.036 98.201,79.036 98.201,75.333

## Silkscreen, mask and mechanical layers (free items; w line width, h text height)
Top Overlay:
  lines w0.1: 80.888,78.6 80.888,78.159 81.314,78.159 81.314,81.2 81.688,81.2 81.688,80.9 ; 108.8,87.9 109.5,86.4 ; 109.7,86.7 109.5,86.4 ; 109.5,86.4 109.1,86.5 109.5,86.4 ; 78.9,78.1 81.314,79.679 78.9,81.2 78.9,78.1
  text "Trace Spacing" at 216.6,294.6 h1.52
  text "Impedance trace to copper" at 227,294.6 h1.52
  text "Trace Width" at 207.8,294.5 h1.52
  text "Bottom Ref" at 199.9,294.3 h1.52
  text "Type" at 178.6,293.8 h1.52
  text "Signal Layer" at 183,293.8 h1.52
  text "Top Ref" at 192.6,293.8 h1.52
  text "Impedance (Ω)" at 157.954,292.762 h1.52
  text "Impedance (Ω) / Type / Signal Layer / Top Ref / Bottom Ref / Trace Width / Trace Spacing / Impedance trace to copper / 50 / Single Ended (Non coplanar) / L / 1 / / / L / 2 / 0.1509 / / / / / 50 / Single Ended (Non coplanar) / L / 3 / L / 2 / L / 5 / 0.1313 / / / / / 50 / Single Ended (Non coplanar) / L / 6 / L / 5 / / / 0.1509 / / / /" at 151.7,178.8 h1.52
  text "JLC06121H-3313A(Special/Finished thickness1.17mm±10%)" at 64.262,114.655 h1.52
  text "EC-4pole 32 Ø32 mm, brushless, 480 Watt" at 90,111.2 h1.52
  text "NC" at 110.185,88.594 h1
  text "GND" at 110.185,87.094 h1
  text "SWCLK" at 110.185,85.594 h1
  text "SWDIO" at 110.185,84.094 h1
Bottom Overlay:
  lines w0.1: 99.3,89.8 99,90 ; 99.4,90.2 99,90 ; 99.9,90.3 99.6,90 99,90 ; 100.4,92.4 100.6,92.5 102.7,92.5 103.2,93 ; 102.9,93 103.2,93 ; 112.1,83.2 111.6,83.5 ; 113.314,82.716 112.4,83.5 111.6,83.5 ; 103.2,93 103.2,92.7 103.2,93 ; 111.6,83.5 112.1,83.8 111.6,83.5
  lines w0.254: 105.4,83 111,83 111,85.9 105.4,85.9 105.4,83
  text "+5V" at 98.089,102.3 h1 r90
  text "CP" at 99.589,102.3 h1 r90
  text "CN" at 101.089,102.3 h1 r90
  text "GND" at 102.589,102.3 h1 r90
  text "CS" at 106.289,85.5 h1 r90
  text "SCK" at 107.169,85.5 h1 r90
  text "MOSI" at 108.049,85.5 h1 r90
  text "MISO" at 108.929,85.5 h1 r90
  text "GND" at 109.809,85.5 h1 r90
  text "+5V" at 110.689,85.5 h1 r90
Mechanical 1:
  circle w0.013: c121.047,77.187 r1.25
  circle w0.013: c85.547,77.187 r0.625
  lines w0.013: 74.357,73.187 ccw(c100.047,77.187) 81.663,58.803 ccw(c100.047,77.187) 118.432,58.803 ccw(c100.047,77.187) 125.738,73.187 ccw(c100.047,77.187) 125.738,81.187 ccw(c100.047,77.187) 118.432,95.572 ccw(c100.047,77.187) 81.663,95.572 ccw(c100.047,77.187) 74.357,81.187 ccw(c100.047,77.187) 74.357,73.187